# Altium PCB PCB._RFID.PcbDoc
Units mm, origin at the board's own origin, x right, y up, seen from the top; angles counter-clockwise.
Board outline 55 x 58.05 mm, 2 copper layers (Top Layer, Bottom Layer); 46 components, 55 nets, 176 pads, 4 vias.
Unrouted connection lines stored in the file: 33.
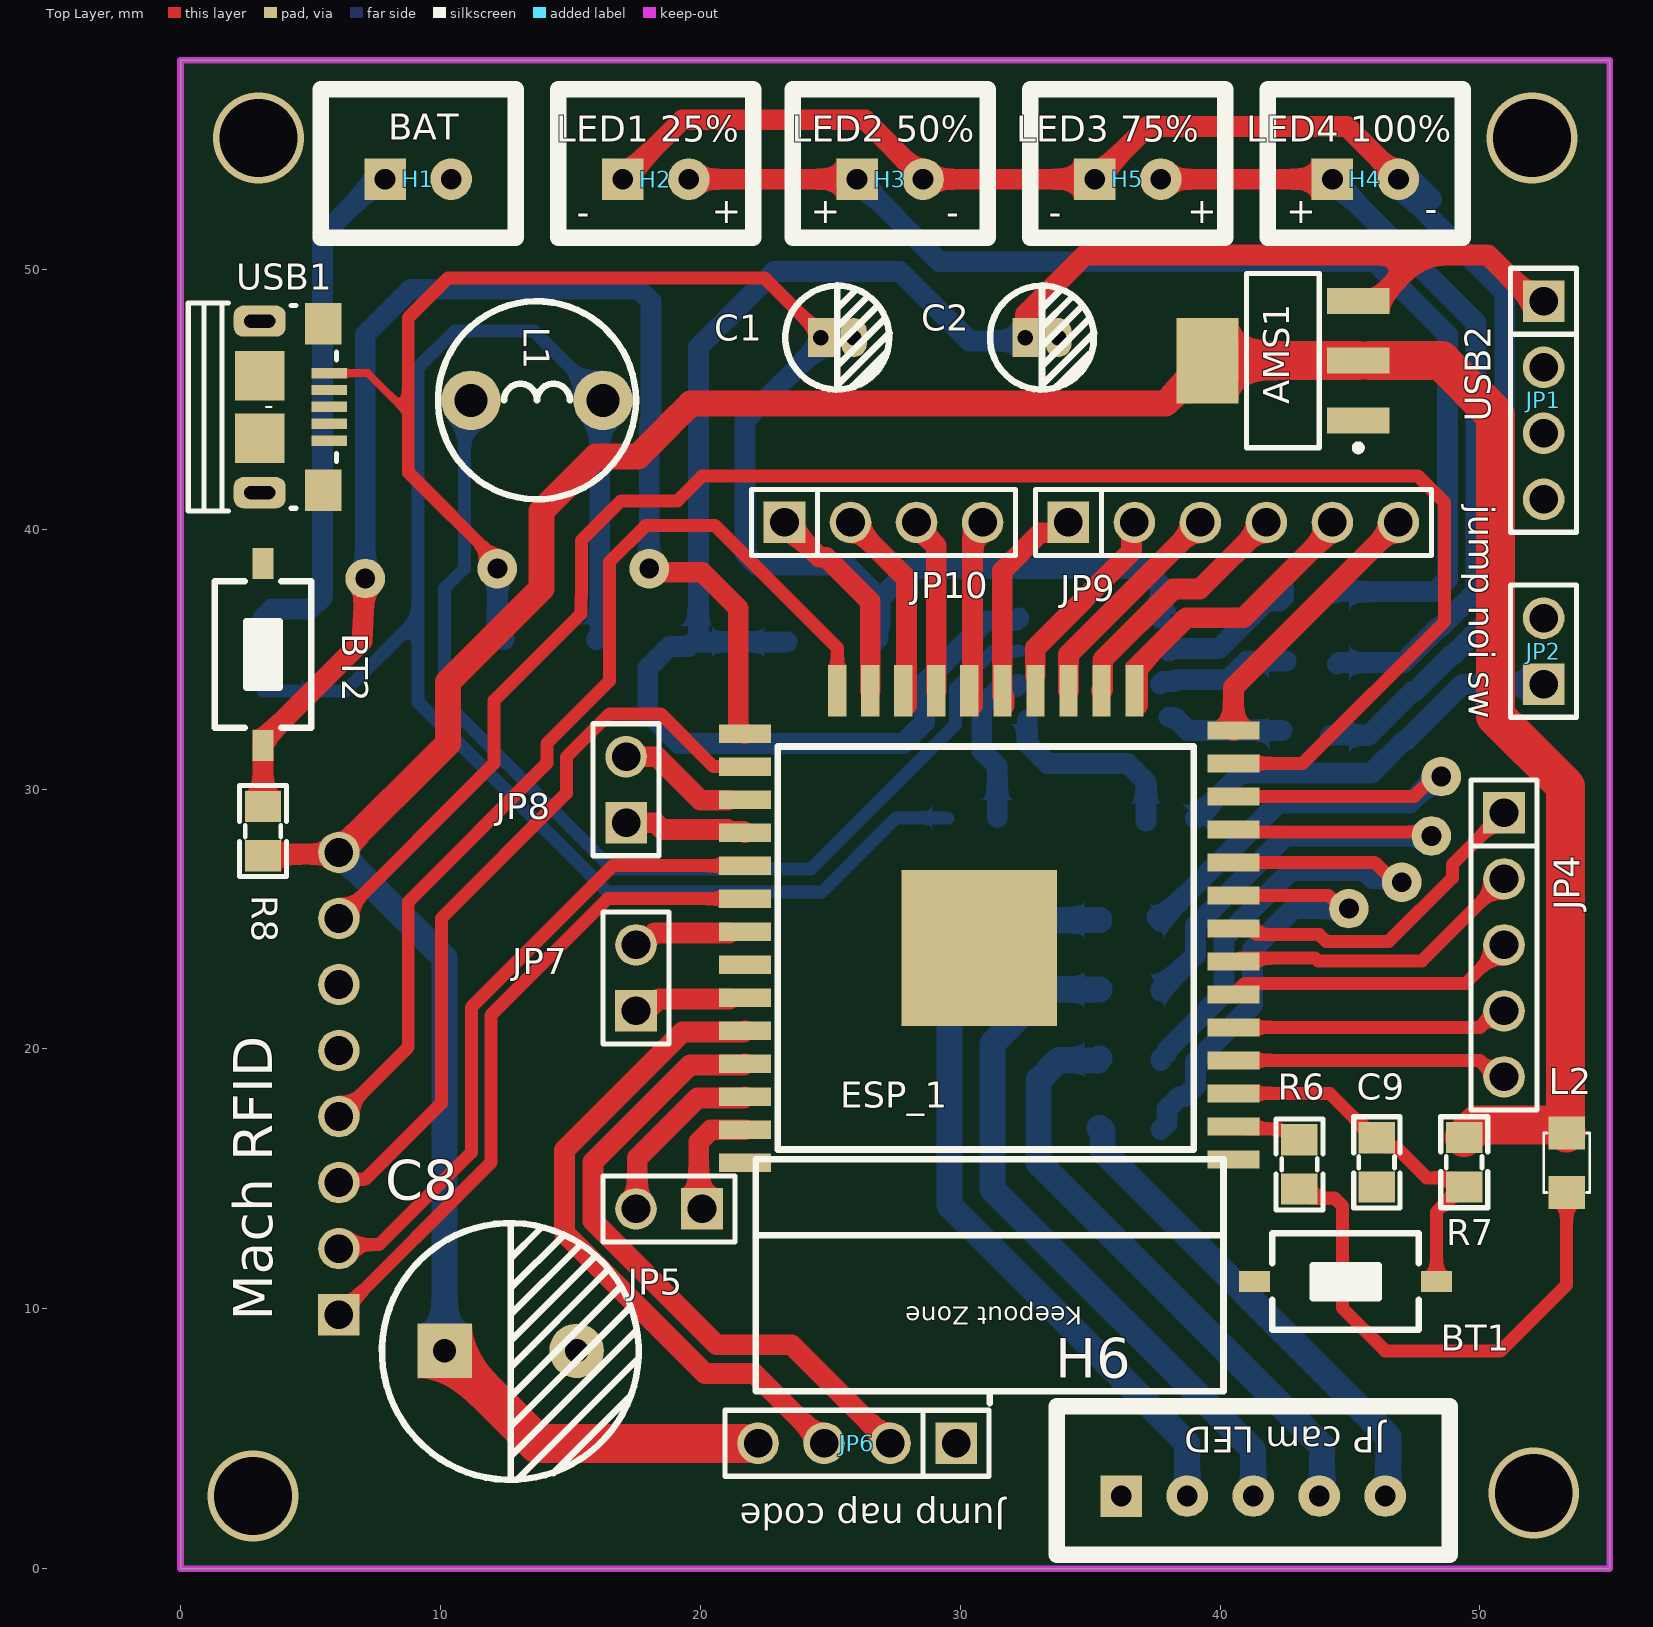
[diagram p0: Top Layer view]
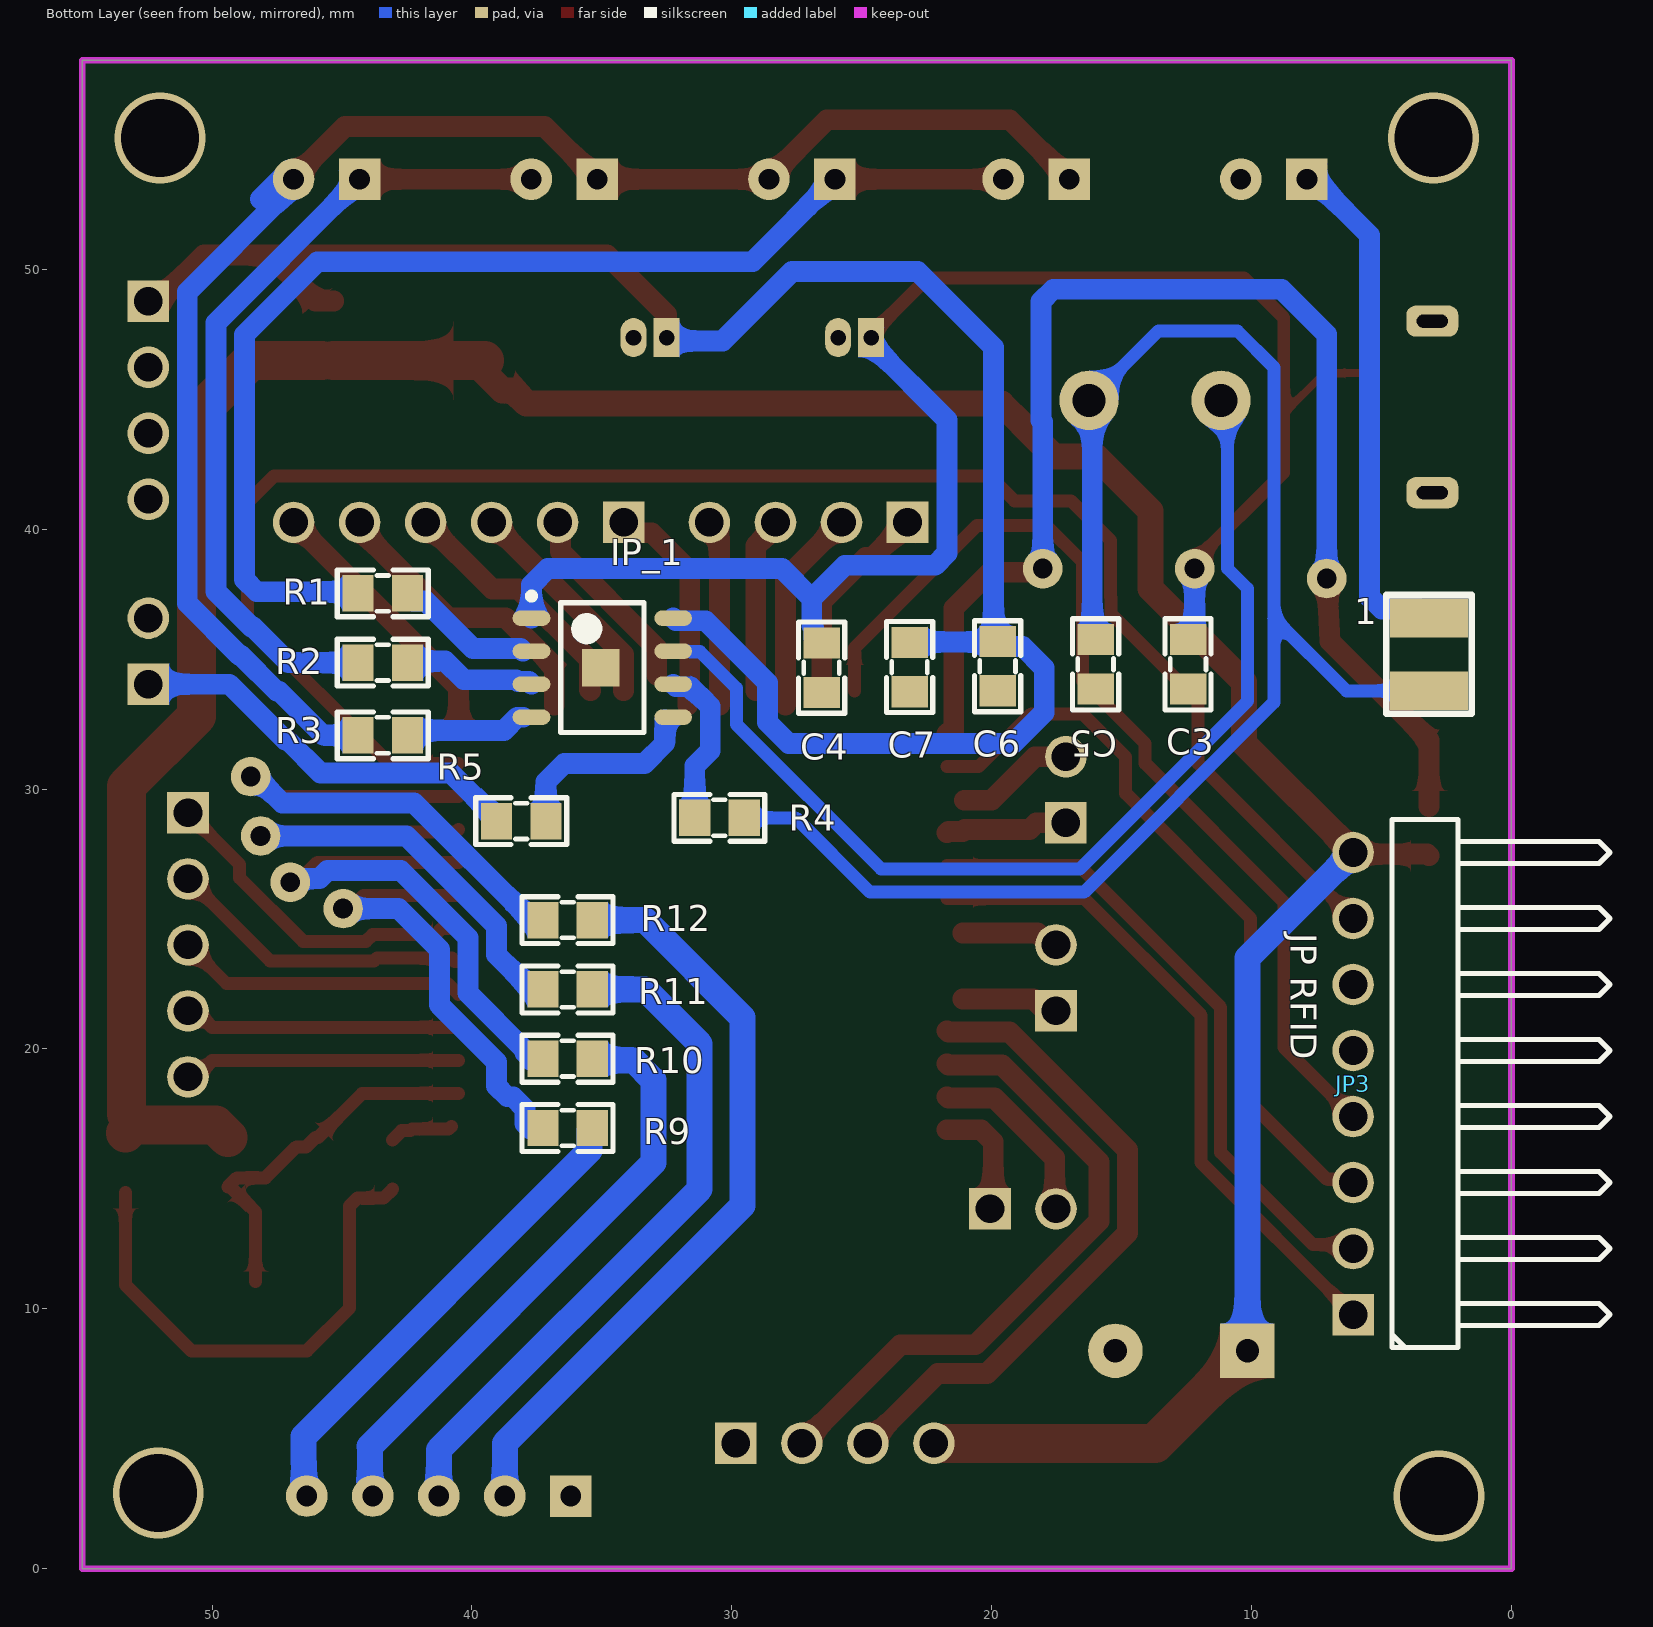
[diagram p1: Bottom Layer view, seen from below]
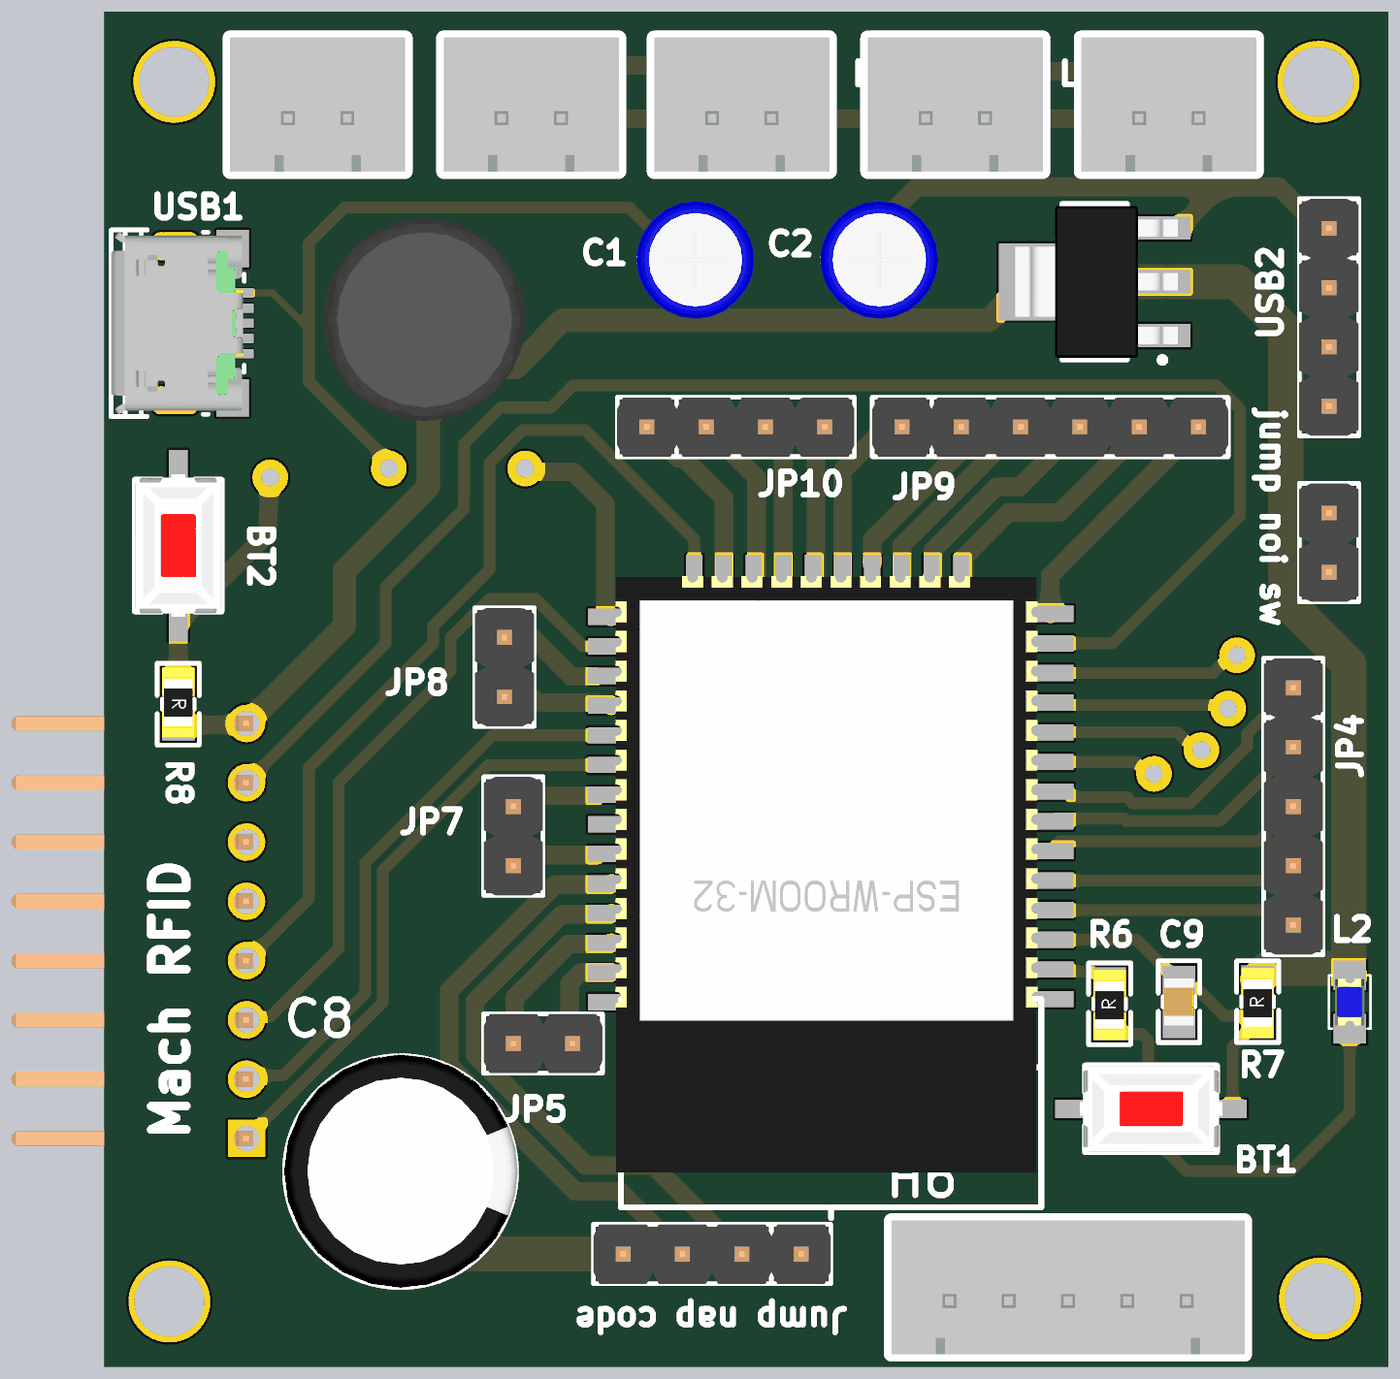
[diagram p2: 3D render of the assembled board from above, using the file's embedded part models]
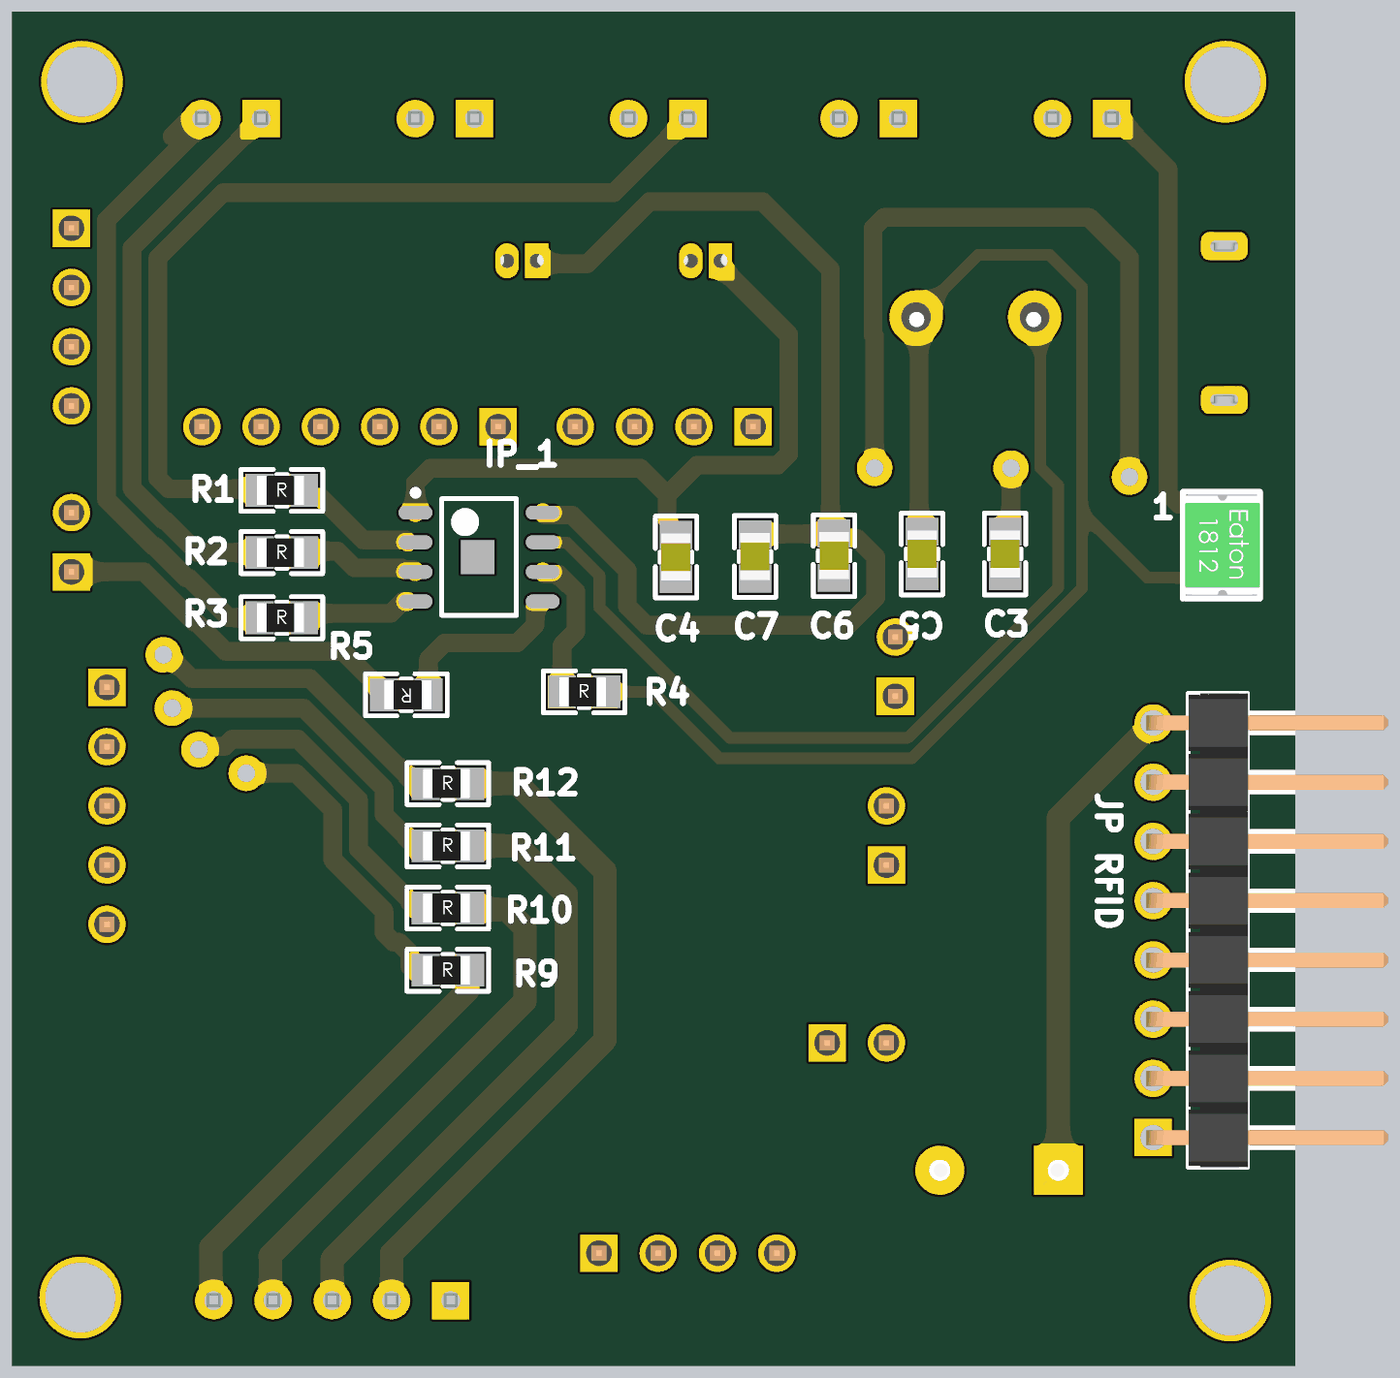
[diagram p3: 3D render of the assembled board from below, using the file's embedded part models]

## Layer stack, top to bottom
Top Solder: solder mask 0.0102, Solder Resist, Dk 3.5
Top Layer: signal copper 0.0356
Dielectric 1: dielectric 0.32, FR-4, Dk 4.8
Bottom Layer: signal copper 0.0356
Bottom Solder: solder mask 0.0102, Solder Resist, Dk 3.5

## Board outline
0,0 0,58.048 55,58.048 55,0

## Design rules (kind name [scope] priority, off if disabled: settings)
Clearance [All] p1: gap=0.25 ignorepadtopadclearanceinfootprint=FALSE
PolygonConnect [All] p1: connectstyle=Relief reliefconductorwidth=0.254 reliefentries=4 polygonreliefangle="90 Angle" airgapwidth=0.254
RoomDefinition Schematic_RFID [InComponentClass('Schematic_RFID')] p1: confinementstyle=ConfineIn formatcopy=TRUE lockcomponents=FALSE outline 59.055,5.151 379.222,5.151 379.222,36.901 59.055,36.901
RoutingVias [All] p1: holewidth=0.711 width=1.27 viastyle="Through Hole" minholewidth=0.711 minwidth=1.27 maxholewidth=0.711 maxwidth=1.27
SolderMaskExpansion [All] p1: expansion=0.102 istentingtop=FALSE
Width [All] p1: maxlimit=1.5 minlimit=0.3 preferedwidth=0.8
Width GND [InNet('GND')] p2: maxlimit=1.5 minlimit=0.5 preferedwidth=1
Width 3V3 [InNet('3V3')] p3: maxlimit=1.5 minlimit=0.5 preferedwidth=1
30 further rules are at their usual default settings.

## Components (designator, comment, footprint, x,y, rotation, side; value= is the part's Value field where it differs from the comment)
1 "1812_1A_8V_SMD" 1812_1A_8V_SMD 3.175,36.576 r270 bottom
AMS1 "AMS1117-3.3V" SOT223 42.418,46.482 r90 top value="AMS1117-3.3V SOT223"
BT1 "Nut Nhan 2 Chan SMD 3x6x2.5" "Nut Nhan 2 Chan SMD 3x6x2.5" 44.831,11.049 r0 top
BT2 "Nut Nhan 2 Chan SMD 3x6x2.5" "Nut Nhan 2 Chan SMD 3x6x2.5" 3.175,35.179 r270 top
C1 "10uF" "tu hoa 4mm" 25.273,47.371 r0 top
C2 "10uF" "tu hoa 4mm" 33.147,47.371 r0 top
C3 "471" "tu 0805" 12.446,34.798 r90 bottom
C4 "105" "tu 0805" 26.543,34.671 r270 bottom
C5 "471" "tu 0805" 16.002,34.798 r90 bottom
C6 "471" "tu 0805" 19.772,34.725 r90 bottom
C7 "105" "tu 0805" 23.157,34.698 r270 bottom
C8 "220uF" "tu hoa 10mm" 12.7,8.382 r0 top
C9 "106" "tu 0805" 46.031,15.637 r270 top
ESP_1 "ESP32" ESP32_chip 40.132,12.827 r180 top
H1 "Header BAT 18650" XH2.54M-2 7.874,53.467 r0 top
H2 "LED1 25%" XH2.54M-2 17.018,53.467 r0 top
H3 "LED2 50%" XH2.54M-2 26.035,53.467 r0 top
H4 "LED4 100%" XH2.54M-2 44.323,53.467 r0 top
H5 "LED3 75%" XH2.54M-2 35.179,53.467 r0 top
H6 "JP cam LED" XH2.54M-5 36.195,2.794 r0 top
IP_1 "IP5306" IP5306 34.983,34.671 r180 bottom
JP1 "USB2" "JP 1x4 DT" 52.451,48.768 r270 top
JP2 "jump noi sw" "JP 1x2 DT" 52.451,34.036 r90 top
JP3 "JP RFID" "JP 1x8 DC" 3.556,28.829 r90 bottom
JP4 "JP 1x5 2.54" "JP 1x5 DT" 50.927,29.083 r270 top
JP5 "JP 1x2 2.54" "JP 1x2 DT" 20.066,13.843 r180 top
JP6 "Jump nap code" "JP 1x4 DT" 29.845,4.826 r180 top
JP7 "JP 1x2 2.54" "JP 1x2 DT" 17.526,21.463 r90 top
JP8 "JP 1x2 2.54" "JP 1x2 DT" 17.145,28.702 r90 top
JP9 "JP 1x6 2.54" "JP 1x6 DT" 34.163,40.259 r0 top
JP10 "JP 1x4 2.54" "JP 1x4 DT" 23.241,40.259 r0 top
L1 "1uH 3A" "CUON CAM 100uH3A" 13.716,44.958 r0 top
L2 "LED 0805" LED-0805-Blue 53.34,16.764 r270 top
R1 "1k" "tro smd 0805" 43.434,37.592 r180 bottom
R2 "1k" "tro smd 0805" 43.434,34.925 r180 bottom
R3 "1k" "tro smd 0805" 43.434,32.131 r180 bottom
R4 "0R" "tro smd 0805" 30.48,28.956 r180 bottom
R5 "10k" "tro smd 0805" 38.1,28.702 r0 bottom
R6 "330R" "Tro SMD 0805" 42.992,15.551 r90 top
R7 "10k" "tro smd 0805" 49.333,15.637 r90 top
R8 "10k" "tro smd 0805" 3.236,28.386 r270 top
R9 "330R" "Tro SMD 0805" 36.322,17.018 r180 bottom
R10 "330R" "Tro SMD 0805" 36.322,19.685 r180 bottom
R11 "330R" "Tro SMD 0805" 36.322,22.352 r180 bottom
R12 "330R" "Tro SMD 0805" 36.322,25.019 r180 bottom
USB1 "USB Micro 5p DIP" "USB Micro 5p DIP" 3.048,44.704 r270 top

## Footprints (in the part's own frame and the unit in brackets; to place one, negate y for a bottom-side part, rotate by r counter-clockwise, add the part's x,y. Pads: shape width x height; smd on the part's side, far side on the other; paste and mask are expansions set on the pad)
1812_1A_8V_SMD [mm]
  rect 1.5x3 smd: 1(0,0) 2(2.794,0)
  silkscreen extent -0.89,-1.65 3.68,1.65, body extent -0.72,-1.55 3.51,1.65, height 1.42
"CUON CAM 100uH3A" [mil] "100uH3A"
  round 90 hole 50: 1(-100,0) 2(100,0)
  silkscreen extent -150,-150 150,150, body extent -171,-175 171,167, height 394
ESP32_chip [mm]
  rect 2x0.7 smd: 1(-0.381,-2.921) 2(-0.381,-4.191) 3(-0.381,-5.461) 4(-0.381,-6.731) 5(-0.381,-8.001) 6(-0.381,-9.271) 7(-0.381,-10.541) 8(-0.381,-11.811) 9(-0.381,-13.081) 10(-0.381,-14.351) 11(-0.381,-15.621) 12(-0.381,-16.891) 13(-0.381,-18.161) 14(-0.381,-19.431) 25(18.415,-19.304) 26(18.415,-18.034) 27(18.415,-16.764) 28(18.415,-15.494) 29(18.415,-14.224) 30(18.415,-12.954) 31(18.415,-11.684) 32(18.415,-10.414) 33(18.415,-9.144) 34(18.415,-7.874) 35(18.415,-6.604) 36(18.415,-5.334) 37(18.415,-4.064) 38(18.415,-2.794)
  rect 6x6 smd: 1(9.398,-11.049)
  rect 0.7x2 smd: 15(3.429,-20.955) 16(4.699,-20.955) 17(5.969,-20.955) 18(7.239,-20.955) 19(8.509,-20.955) 20(9.779,-20.955) 21(11.049,-20.955) 22(12.319,-20.955) 23(13.589,-20.955) 24(14.859,-20.955)
  silkscreen extent 0,-18.81 18,6.46, body extent 0.17,-21.04 18.24,4.5, height 3.4
IP5306 [mm] "SOP, 8-Leads, Body 4.90x3.90mm, Pitch 1.27mm, IPC Medium Density"
  oval 1.45x0.6 smd: 1(-2.725,1.905) 2(-2.725,0.635) 3(-2.725,-0.635) 4(-2.725,-1.905) 5(2.725,-1.905) 6(2.725,-0.635) 7(2.725,0.635) 8(2.725,1.905)
  rect 1.45x1.45 smd: 9(-0.058,0)
  silkscreen extent -2.85,-2.5 1.6,2.88, body extent -2,-2.5 2,2.5, height 0.25
"JP 1x2 DT" [mm] "2 pins, 1 row, straight, gold plating"
  rect 1.6x1.6 hole 1.1: 1(0,0)
  round 1.6 hole 1.1: 2(2.54,0)
  silkscreen extent -1.27,-1.27 3.81,1.27, body extent -1.27,-1.27 3.81,1.27, height 8.54
"JP 1x4 DT" [mm] "4 pins, 1 row, straight, gold plating"
  rect 1.6x1.6 hole 1.1: 1(0,0)
  round 1.6 hole 1.1: 2(2.54,0) 3(5.08,0) 4(7.62,0)
  silkscreen extent -1.27,-1.27 8.89,1.27, body extent -1.27,-1.27 8.89,1.27, height 8.54
"JP 1x5 DT" [mm] "5 pins, 1 row, straight, gold plating"
  rect 1.6x1.6 hole 1.1: 1(0,0)
  round 1.6 hole 1.1: 2(2.54,0) 3(5.08,0) 4(7.62,0) 5(10.16,0)
  silkscreen extent -1.27,-1.27 11.43,1.27, body extent -1.27,-1.27 11.43,1.27, height 8.54
"JP 1x6 DT" [mm] "6 pins, 1 row, straight, gold plating"
  rect 1.6x1.6 hole 1.1: 1(0,0)
  round 1.6 hole 1.1: 2(2.54,0) 3(5.08,0) 4(7.62,0) 5(10.16,0) 6(12.7,0)
  silkscreen extent -1.27,-1.27 13.97,1.27, body extent -1.27,-1.27 13.97,1.27, height 8.54
"JP 1x8 DC" [mm] "8 pins, 1 row, right angled, gold plating"
  rect 1.6x1.6 hole 1.1: 1(-19.05,2.54)
  round 1.6 hole 1.1: 2(-16.51,2.54) 3(-13.97,2.54) 4(-11.43,2.54) 5(-8.89,2.54) 6(-6.35,2.54) 7(-3.81,2.54) 8(-1.27,2.54)
  silkscreen extent -20.32,-7.34 0,1.04, body extent -20.32,-7.52 0,2.84, height 2.55
LED-0805-Blue [mil]
  rect 50x55 smd: 1(0,0) 2(90,0)
  silkscreen extent 0,-35 90,35, body extent 5,-25 85,25, height 43
"Nut Nhan 2 Chan SMD 3x6x2.5" [mm] "Switch SMD type"
  rect 1.2x0.8 smd: 1(-3.5,0) 2(3.5,0)
  silkscreen extent -2.82,-1.85 2.82,1.85, body extent -3.05,-1.85 3.05,1.85, height 2.5
SOT223 [mm]
  rect 1x2.4 smd: 1(-2.3,-2.9) 2(0,-2.9) 3(2.3,-2.9)
  rect 3.3x2.4 smd: 4(0,2.9)
  silkscreen extent -3.47,-3.03 3.35,1.4, body extent -3.25,-3.56 3.25,3.4, height 1.68
"tro smd 0805" [mm]
  rect 1.2x1.4 smd: 1(-0.946,-0.061) 2(0.954,-0.061)
  silkscreen extent -1.75,-0.97 1.75,0.84, body extent -1.56,-0.76 1.44,0.64, height 0.53
"Tro SMD 0805" [mm]
  rect 1.2x1.4 smd: 1(-0.946,-0.061) 2(0.954,-0.061)
  silkscreen extent -1.75,-0.97 1.75,0.84, body extent -1.56,-0.76 1.44,0.64, height 0.53
"tu 0805" [mm] "Compoment SMD 80x50mil"
  rect 1.2x1.4 smd: 1(-0.946,-0.003) 2(0.954,-0.003)
  silkscreen extent -1.75,-0.89 1.75,0.89, body extent -1.01,-0.64 1.01,0.63, height 0.61
"tu hoa 4mm" [mm]
  rect 1x1.5 hole 0.6: 1(-0.635,0)
  oval 1x1.5 hole 0.6: 2(0.635,0)
  silkscreen extent -2,-2 2.01,2.01, body extent -2.47,-2.47 2.58,2.58, height 14.81
"tu hoa 10mm" [mm]
  rect 2.1x2.1 hole 0.9: 1(-2.54,0)
  round 2.1 hole 0.9: 2(2.54,0)
  silkscreen extent -4.95,-4.96 4.93,4.92, body extent -5,-5 4.97,5, height 20.01
"USB Micro 5p DIP" [mm]
  rect 0.4x1.35 smd mask+0.05: 1(-1.3,2.675) 2(-0.65,2.675) 3(0,2.675) 4(0.65,2.675) 5(1.3,2.675)
  rrect60% 1.2x2 hole 0.5 slot 1.2 at 90 deg: 5(-3.3,0) 5(3.3,0)
  rect 1.6x1.4 smd: 5(-3.2,2.45) 5(3.2,2.45)
  rect 1.9x1.9 smd paste-10: 5(-1.2,0) 5(1.2,0)
  silkscreen extent -4,-2.75 4,2.95, body extent -3.93,-2.76 3.93,2.9, height 2.85
XH2.54M-2 [mm]
  rect 1.6x1.6 hole 0.8: 1(0,0)
  round 1.6 hole 0.8: 2(2.54,0)
  silkscreen extent -2.48,-2.26 5.02,3.46, body extent -2.48,-2.26 5.02,3.48, height 6.91
XH2.54M-5 [mm]
  rect 1.6x1.6 hole 0.8: 1(0,0)
  round 1.6 hole 0.8: 2(2.54,0) 3(5.08,0) 4(7.62,0) 5(10.16,0)
  silkscreen extent -2.48,-2.26 12.64,3.46, body extent -2.48,-2.26 12.64,3.48, height 6.91

## Part data
AMS1: library part "AMS1117 SMD", "Dán", Chung_Loai=Dán, Don_Vi=Con, Ma_Hang=MH000596
C1 C2: library part "Tu Hoa 10uF 25V 4x7", "Cắm", Chung_Loai=Cắm, Don_Vi=Con, Ma_Hang=MH001349, So_Chan=2, Ten_Linh_Kien="Tụ Hóa 10uF 25V 4x7MM"
C3 C5 C6: library part "Tu 0805 471 50V 10%", "Dán", Chung_Loai=Dán, Don_Vi=Con, Ma_Hang=MH004564, So_Chan=2, Ten_Linh_Kien="Tụ 0805 471-470 10% 50V"
C4 C7: library part "Tu 0805 105 50V 10%", "Dán", Chung_Loai=Dán, Don_Vi=Con, Ma_Hang=MH004552, So_Chan=2, Ten_Linh_Kien="Tụ 0805 105-1uF 10% 50V"
C8: library part "Tu Hoa 220uF 50V 10x14", "Cắm", Chung_Loai=Cắm, Don_Vi=Con, Ma_Hang=MH006873, So_Chan=2, Ten_Linh_Kien="Tụ Hóa 220uF 50V"
C9: library part "Tu 0805 106 16V 10%", "Dán", Chung_Loai=Dán, Don_Vi=Con, Ma_Hang=MH004553, So_Chan=2, Ten_Linh_Kien="Tụ 0805 106-10uF 10% 16V"
ESP_1: library part ESP32_CHIP
H1 H2 H3 H4 H5: library part "Header 2P 2.54 Duc Thang", "Cắm", Chung_Loai=Cắm, Don_Vi=Con, Ma_Hang=MH001283, Ten_Linh_Kien="Header 2P XH2.54-2P Đực Thẳng"
H6: library part "Header 5P 2.54 Duc Thang", "Cắm", Chung_Loai=Cắm, Don_Vi=Con, Ma_Hang=MH001298, Ten_Linh_Kien="Header 5P XH2.54-5P Đực Thẳng"
JP1 JP6 JP10: library part "JP 1x4 2.54 Duc Thang", "Cắm", Chung_Loai=Cắm, Don_Vi=Con, Ma_Hang=MH000903, Ten_Linh_Kien="Jump Đơn Đực 2.54MM 1x40P Thẳng 11MM"
JP2 JP5 JP7 JP8: library part "JP 1x2 2.54 Duc Thang", "Cắm", Chung_Loai=Cắm, Don_Vi=Con, Ma_Hang=MH000903, Ten_Linh_Kien="Jump Đơn Đực 2.54MM 1x40P Thẳng 11MM"
JP3: library part "JP 1x8 2.54 Duc Cong", "Cắm", Chung_Loai=Cắm, Don_Vi=Con, Ma_Hang=MH000904, Ten_Linh_Kien="Jump Đơn Đực 2.54MM 1x40P Cong Đứng"
JP4: library part "JP 1x5 2.54 Duc Thang", "Cắm", Chung_Loai=Cắm, Don_Vi=Con, Ma_Hang=MH000903, Ten_Linh_Kien="Jump Đơn Đực 2.54MM 1x40P Thẳng 11MM"
JP9: library part "JP 1x6 2.54 Duc Thang", "Cắm", Chung_Loai=Cắm, Don_Vi=Con, Ma_Hang=MH000903, Ten_Linh_Kien="Jump Đơn Đực 2.54MM 1x40P Thẳng 11MM"
L1: library part "CUON CAM 100uH DIP", "Dán", Chung_Loai=Dán, Don_Vi=Con, Ma_Hang=MH002209, Ten_Linh_Kien="Cuộn Cảm 100uH 3A 8x10MM"
L2: library part "LED 0805 Xanh Duong", "Dán", Chung_Loai=Dán, Don_Vi=Con, Ma_Hang=MH002327, Ten_Linh_Kien="LED 0805 Màu Xanh Dương (Blue)"
R1 R2 R3: library part "Tro 0805 1% 1k", "Dán", Chung_Loai=Dán, Don_Vi=Con, Ma_Hang=MH005468, So_Chan=2, Ten_Linh_Kien="Trở 0805 1% 1k"
R4: library part "Tro 0805 5% 0R", "Dán", Chung_Loai=Dán, Don_Vi=Con, Ma_Hang=MH005230, So_Chan=2, Ten_Linh_Kien="Trở 0805 5% 0R"
R5: library part "Tro 0805 5% 10k", "Dán", Chung_Loai=Dán, Don_Vi=Con, Ma_Hang=MH005239, So_Chan=2, Ten_Linh_Kien="Trở 0805 5% 10k"
R6 R9 R10 R11 R12: library part "Tro 0805 5% 330R", "Dán", Chung_Loai=Dán, Don_Vi=Con, Ma_Hang=MH005337, So_Chan=2, Ten_Linh_Kien="Trở 0805 5% 330R"
R7 R8: library part "Tro 0805 1% 10k", "Dán", Chung_Loai=Dán, Don_Vi=Con, Ma_Hang=MH005473, So_Chan=2, Ten_Linh_Kien="Trở 0805 1% 10k"
USB1: "USB Type B", Ma_Hang=MH005145, Ten="MicroUSB MK5P DIP"
BT1 BT2: Ma_Hang=MH001036, Ten="Nút Nhấn 2 Chân 3x6x2.5MM SMD"

## Free pads (board coordinates)
  round 1.524 hole 0.762: 2(7.112,38.1) 2(18.034,38.481) ""(12.192,38.481) ""(44.958,25.4) ""(46.99,26.416) ""(48.133,28.194) ""(48.514,30.48)

## Via types
v1: diameter 3.5, hole 3, Top Layer to Bottom Layer, 4 vias

## Nets (pads, with @x,y where several pads share a name; then routed paths per layer and width w, separated by ;. In a path a pad name is that pad's centre, name@x,y a point inside that pad or via, vN(x,y) a via of type N, cw(c..) or ccw(c..) an arc to the next point about the centre after c; other vN are vias at no path point)
3V3: AMS1.2 AMS1.4 C8.1 JP3.8 JP6.4 L2.1 R7.2 R8.2 | length 125.9
  Top Layer w0.8: R8.2 3.238,27.495 6.032,27.495 JP3.8
  Top Layer w1: JP3.8 10.287,31.75 10.287,34.113 13.881,37.707 13.881,40.69 15.99,42.799 17.607,42.799 18.834,44.026 18.834,44.04 19.625,44.831 37.899,44.831 38.4,45.332 38.818,45.332 39.518,46.032 AMS1.4
  Top Layer w1.5: C8.1 13.716,4.826 JP6.4 ; AMS1.4 AMS1.2 ; AMS1.2@45.768,46.482 48.514,46.482 50.601,44.395 50.601,36.217 50.601,32.801 53.298,30.104 53.298,17.492 ; R7.2 49.875,17.073 53.031,17.073 L2.1
  Bottom Layer w1: JP3.8 10.16,23.495 C8.1 ; JP6.4@22.225,4.763 JP6.4
13: ESP_1.16 JP9.4 | length 9.7
  Top Layer w0.8: ESP_1.16 35.483,33.832 35.483,34.975 38.202,37.694 39.218,37.694 JP9.4
14: ESP_1.14 JP9.6 | length 10.6
  Top Layer w0.8: ESP_1.14 40.513,33.909 JP9.6
15: ESP_1.23 JP10.1 | length 8
  Top Layer w0.8: JP10.1 24.581,38.919 24.835,38.919 26.543,37.211 ESP_1.23
16: ESP_1.27 JP8.2 | length 4.6
  Top Layer w0.8: JP8.2 18.338,31.242 20.01,29.569 ESP_1.27@21.046,29.569
17: ESP_1.28 JP8.1 | length 4.7
  Top Layer w0.8: JP8.1 18.288,28.702 18.542,28.448 21.04,28.448 21.117,28.371 21.667,28.371 ESP_1.28
19: ESP_1.31 JP7.2 | length 3.8
  Top Layer w0.8: JP7.2@17.606,23.829 18.238,24.461 ESP_1.31@21.117,24.461
21: ESP_1.33 JP7.1 | length 4.3
  Top Layer w0.8: JP7.1@17.242,21.179 JP7.1 ; JP7.1@17.671,21.227 JP7.1@17.925,21.227 ; JP7.1@17.926,21.228 17.926,21.452 18.395,21.921 ESP_1.33@21.117,21.921
22: ESP_1.36 JP5.2 | length 6.8
  Top Layer w0.8: JP5.2@17.578,14.097 17.578,15.8 19.889,18.111 21.667,18.111 ESP_1.36
23: ESP_1.37 JP5.1 | length 4.1
  Top Layer w0.8: JP5.1@19.939,14.267 19.939,16.422 20.408,16.891 ESP_1.37
25: ESP_1.10 pad.@46.99,26.416 R10.1 | length 20.6
  Top Layer w0.5: ESP_1.10 45.951,27.178 46.713,26.416 pad.@46.99,26.416
  Bottom Layer w0.8: R10.1@37.719,19.558 37.719,19.621 37.954,19.856 37.954,19.952 40.154,22.152 40.154,24.279 42.737,26.862 45.564,26.862 45.871,26.555 46.851,26.555 pad.@46.99,26.416
26: ESP_1.11 pad.@48.133,28.194 R11.1 | length 21.3
  Top Layer w0.5: ESP_1.11 40.613,28.348 47.979,28.348 pad.@48.133,28.194
  Bottom Layer w0.8: R11.1@37.719,22.225 37.719,22.288 39.054,23.624 39.054,24.735 42.513,28.194 pad.@48.133,28.194
27: ESP_1.12 pad.@48.514,30.48 R12.1 | length 21.6
  Top Layer w0.5: ESP_1.12 47.475,29.718 48.237,30.48 pad.@48.514,30.48
  Bottom Layer w0.8: R12.1@37.565,25.08 R12.1@37.659,25.174 ; R12.1@37.719,24.892 37.719,24.956 42.227,29.464 47.302,29.464 48.318,30.48 pad.@48.514,30.48
32: ESP_1.8 JP4.1 | length 13
  Top Layer w0.5: ESP_1.8 41.163,24.638 41.402,24.399 43.819,24.399 44.08,24.138 46.497,24.138 48.945,26.586 48.945,27.101 JP4.1
33: ESP_1.9 pad.@44.958,25.4 R9.1 | length 17.5
  Top Layer w0.5: ESP_1.9 44.173,25.908 44.681,25.4 pad.@44.958,25.4
  Bottom Layer w0.8: R9.1@37.719,16.891 37.954,17.126 37.954,17.691 38.423,18.159 38.644,18.159 39.054,18.57 39.054,19.496 41.254,21.696 41.254,23.823 42.831,25.4 pad.@44.958,25.4
34: ESP_1.6 JP4.3 | length 11.2
  Top Layer w0.5: ESP_1.6 40.933,22.518 49.442,22.518 JP4.3
35: ESP_1.7 JP4.2 | length 12.1
  Top Layer w0.5: ESP_1.7 40.667,23.368 40.767,23.468 40.767,23.495 43.662,23.495 43.769,23.388 47.772,23.388 JP4.2
  Top Layer w0.8: JP4.2@50.927,26.327 JP4.2
BAT: 1.1 H1.1 | length 19.6
  Bottom Layer w0.8: 1.1 3.525,36.926 4.992,36.926 5.461,37.395 5.461,51.308 7.22,53.067 7.474,53.067 H1.1@7.683,53.276
BOOT: BT2.2 ESP_1.25 pad.2 R8.1 | length 50.7
  Top Layer w0.8: R8.1 BT2.2 3.175,31.879 6.985,35.689 pad.2@7.112,38.1 ; pad.2@18.034,38.481 18.173,38.342 20.078,38.342 21.463,36.957 21.463,32.181 21.667,32.181 ESP_1.25
  Bottom Layer w0.8: pad.2@7.112,38.434 7.112,47.498 8.847,49.233 17.63,49.233 18.099,48.764 18.099,44.195 18.034,44.13 pad.2@18.034,38.481
CLK: ESP_1.20 JP10.4 | length 7.2
  Top Layer w0.8: ESP_1.20@30.48,33.239 30.48,39.662 30.861,40.043 JP10.4
CMD: ESP_1.19 JP9.1 | length 8.4
  Top Layer w0.8: ESP_1.19@31.7,33.239 31.7,33.544 31.623,33.621 31.623,38.399 33.083,39.859 33.763,39.859 33.909,40.005 JP9.1@33.909,40.259
EN: BT1.2 C9.1 ESP_1.3 R7.1 | length 14.4
  Top Layer w0.5: ESP_1.3 44.223,18.288 45.928,16.583 C9.1 46.378,16.233 46.759,16.233 47.95,15.042 49.044,15.042 R7.1 ; BT1.2 48.331,13.729 R7.1@49.294,14.692
GND: AMS1.1 BT1.1 BT2.1 C1.2 C2.2 C3.1 C4.2 C5.1 C6.1 C7.2 C8.2 C9.2 ESP_1.1 ESP_1.15 ESP_1.38 H1.2 H6.1 IP_1.9 JP1.4 JP2.2 JP3.6 JP6.1 JP9.5 USB1.5 | length 11.4
  Top Layer w0.8: ESP_1.15@36.83,33.239 36.83,34.713 38.711,36.594 40.912,36.594 43.923,39.605 43.923,39.643 44.323,40.043 JP9.5
  other v1: 2.794,2.794 52.07,2.921 3,55.048 52,55.048
MISO: ESP_1.24 JP3.4 | length 38.8
  Top Layer w0.5: JP3.4 5.969,17.526 6.223,17.526 8.763,20.066 8.763,25.654 14.097,30.988 14.097,31.75 16.508,34.161 16.508,38.74 17.9,40.132 20.574,40.132 25.273,35.433 ESP_1.24
MOSI: ESP_1.26 JP3.3 | length 28.9
  Top Layer w0.5: JP3.3 6.223,14.986 7.112,14.986 10.033,17.907 10.033,25.019 14.847,29.833 14.847,31.23 16.51,32.893 18.474,32.893 20.506,30.861 ESP_1.26
NetESP_1_2: ESP_1.2 R6.2 | length 2.5
  Top Layer w0.5: ESP_1.2@40.794,17.018 40.894,16.918 42.31,16.918 42.373,16.855 42.703,16.855 R6.2
NetH2_1: H2.1 H3.2 H4.2 H5.1 R3.1 | length 62.3
  Top Layer w0.8: H2.1 19.304,55.753 26.339,55.753 28.575,53.517 H3.2 H5.1 37.211,55.499 44.881,55.499 46.863,53.517 H4.2
  Bottom Layer w0.8: R3.1@44.24,32.07 45.723,32.07 47.417,33.764 47.511,33.764 48.882,35.136 48.938,35.136 50.951,37.149 50.951,49.125 47.263,52.813 47.263,52.851 H4.2@46.938,53.175 ; H4.2 47.016,53.314 47.016,53.822 47.27,53.568 48.133,52.705
NetH2_2: H2.2 H3.1 R1.1 | length 45.7
  Top Layer w0.8: H2.2 H3.1
  Bottom Layer w0.8: H3.1 29.21,50.292 45.942,50.292 48.751,47.483 48.751,38.061 48.282,37.592 44.44,37.592 R1.1
NetH4_1: H4.1 H5.2 R2.1 | length 31.3
  Top Layer w0.8: H5.2 H4.1
  Bottom Layer w0.8: H4.1 44.731,53.059 49.851,47.939 49.851,37.605 48.482,36.236 48.427,36.236 47.055,34.864 44.58,34.864 R2.1@44.513,34.798
NetH6_2: H6.2 R12.2 | length 29.5
  Bottom Layer w1: R12.2 33.34,24.958 29.591,21.209 29.591,13.97 38.735,4.826 H6.2
NetH6_3: H6.3 R11.2 | length 26.5
  Bottom Layer w1: R11.2 33.34,22.291 31.242,20.193 31.242,14.605 41.275,4.572 H6.3
NetH6_4: H6.4 R10.2 | length 23.3
  Bottom Layer w1: R10.2 35.301,19.558 33.782,19.558 33.02,18.796 33.02,15.621 43.942,4.699 43.93,4.687 43.93,2.909 H6.4
NetH6_5: H6.5 R9.2 | length 18.8
  Bottom Layer w1: R9.2 35.468,16.857 35.468,16.094 46.482,5.08 46.482,4.083 46.47,4.071 46.47,2.909 H6.5
NetIP_1_2: IP_1.2 R1.2 | length 5.6
  Bottom Layer w0.8: IP_1.2@38.031,35.306 38.131,35.406 39.956,35.406 41.781,37.231 42.28,37.231 42.44,37.392 R1.2@42.44,37.719
NetIP_1_3: IP_1.3 R2.2 | length 5.2
  Bottom Layer w0.8: IP_1.3 37.808,34.136 38.233,34.136 38.303,34.206 40.312,34.206 41.031,34.925 R2.2@42.544,34.925
NetIP_1_4: IP_1.4 R3.2 | length 4.6
  Bottom Layer w0.8: IP_1.4@38.033,32.766 38.256,32.766 38.764,32.258 R3.2@42.393,32.258
NetIP_1_5: IP_1.5 R5.1 | length 7.6
  Bottom Layer w0.8: IP_1.5@32.583,32.666 32.583,31.765 33.36,30.988 36.449,30.988 37.154,30.283 R5.1
NetIP_1_6: IP_1.6 R4.1 | length 6.3
  Bottom Layer w0.8: R4.1 31.426,30.891 30.833,31.484 30.833,33.18 31.589,33.936 32.158,33.936 IP_1.6
NetIP_1_7: IP_1.7 L1.1 | length 41.1
  Bottom Layer w0.5: L1.1 10.93,44.712 10.93,38.489 10.16,37.719 10.16,33.38 16.616,26.924 24.257,26.924 29.826,32.493 29.826,33.89 31.223,35.287 32.112,35.287 32.131,35.306 IP_1.7
NetJP2_1: JP2.1 R5.2 | length 15.5
  Bottom Layer w0.8: R5.2@39.054,28.863 40.814,30.623 45.831,30.623 47.085,31.877 47.179,31.877 49.338,34.036 JP2.1
NetL2_2: L2.2 R6.1 | length 19.8
  Top Layer w0.5: R6.1 43.403,14.255 44.411,14.255 44.704,13.962 44.704,10.033 46.355,8.382 50.8,8.382 53.34,10.922 L2.2
RST: ESP_1.13 JP3.7 | length 68
  Top Layer w0.5: JP3.7 12.065,30.988 12.065,33.401 15.409,36.745 15.409,37.38 15.422,37.393 15.422,39.563 16.952,41.093 19.122,41.093 20.066,42.037 47.625,42.037 48.641,41.021 48.641,36.449 43.18,30.988 ESP_1.13
RX0: ESP_1.34 JP6.3 | length 25.4
  Top Layer w0.8: ESP_1.34 21.667,20.651 19.318,20.651 19.148,20.481 14.775,16.108 14.775,12.917 20.178,7.514 22.077,7.514 JP6.3
SCK: ESP_1.29 JP3.2 | length 25
  Top Layer w0.5: JP3.2 6.249,12.472 7.646,12.472 11.188,16.014 11.188,21.602 16.637,27.051 ESP_1.29
SD0: ESP_1.21 JP10.3 | length 6.8
  Top Layer w0.8: JP10.3@28.194,40.236 29.083,39.347 ESP_1.21
SD1: ESP_1.22 JP10.2 | length 7.9
  Top Layer w0.8: JP10.2 27.94,38.1 ESP_1.22@27.94,33.239
SD2: ESP_1.17 JP9.3 | length 8.6
  Top Layer w0.8: ESP_1.17 34.163,35.179 JP9.3
SD3: ESP_1.18 JP9.2 | length 7.5
  Top Layer w0.8: ESP_1.18@32.893,34.382 32.893,35.433 36.597,39.137 36.597,40.153 JP9.2
SDA: ESP_1.30 JP3.1 | length 25.6
  Top Layer w0.5: JP3.1 11.938,15.621 11.938,21.291 16.428,25.781 ESP_1.30
TX0: ESP_1.35 JP6.2 | length 24.7
  Top Layer w0.8: ESP_1.35 21.667,19.381 19.603,19.381 15.875,15.653 15.875,13.373 20.633,8.614 23.517,8.614 JP6.2
VBAT: 1.2 C5.2 L1.2 R4.2 | length 63.1
  Bottom Layer w0.5: 1.2 6.35,33.782 9.144,36.576 ; L1.2 13.589,47.625 10.541,47.625 9.144,46.228 9.144,36.576 ; R4.2 27.543,28.895 24.683,26.035 16.444,26.035 9.144,33.335 9.144,36.576
  Bottom Layer w0.8: C5.2 16.129,35.883 L1.2@16.129,44.831 ; L1.2@16.761,44.992 16.946,45.178 L1.2@16.764,45.36
VIN: C1.1 C3.2 C4.1 IP_1.1 pad.@12.192,38.481 USB1.1 | length 65.1
  Top Layer w0.3: USB1.1 7.209,46.004 8.763,44.45
  Top Layer w0.5: pad.@12.319,38.735 12.215,38.735 8.763,42.187 8.763,44.45 8.763,48.133 10.287,49.657 22.479,49.657 24.265,47.871 24.388,47.871 24.427,47.832 C1.1@24.427,47.455
  Bottom Layer w0.8: pad.@12.192,38.481 12.192,35.952 12.392,35.752 C3.2 ; C1.1 24.538,47.271 24.538,47.021 21.717,44.2 21.717,39.077 22.186,38.608 25.654,38.608 26.927,37.335 28.074,38.481 37.084,38.481 37.708,37.857 IP_1.1 ; C4.1 26.646,35.617 26.846,35.817 26.846,36.208 26.924,36.285 26.924,37.338
VN: ESP_1.5 JP4.4 | length 11
  Top Layer w0.5: ESP_1.5 49.994,20.828 50.629,21.463 JP4.4
  Top Layer w0.8: JP4.4@50.711,21.464 JP4.4@51.055,21.464
VOUT: AMS1.3 C2.1 C6.2 C7.1 IP_1.8 JP1.1 | length 77
  Top Layer w0.8: C2.1 32.512,48.26 34.798,50.546 47.782,50.546 ; AMS1.3 46.018,48.782 47.782,50.546 ; JP1.1 52.051,49.168 51.69,49.168 50.312,50.546 47.782,50.546
  Bottom Layer w0.8: C6.2 C6.2@19.75,35.661 ; C6.2@19.931,35.68 19.931,46.997 22.845,49.911 27.686,49.911 30.353,47.244 C2.1@32.412,47.244 ; C7.1@23.34,35.661 C6.2@19.75,35.661 ; IP_1.8 32.158,36.476 31.018,36.476 28.633,34.091 28.633,32.573 27.81,31.75 19.177,31.75 17.983,32.944 17.983,34.657 18.806,35.48 19.569,35.48 C6.2@19.75,35.661
VP: ESP_1.4 JP4.5 | length 10.7
  Top Layer w0.5: ESP_1.4 49.994,19.558 50.629,18.923 JP4.5
pads on no net: ESP_1.32 JP1.2 JP1.3 JP3.5 USB1.2 USB1.3 USB1.4

## Keep-outs
Keep-Out Layer:
  the board outline again, w0.254

## Silkscreen, mask and mechanical layers (free items; w line width, h text height)
Top Overlay:
  text "BAT" at 8.001,54.991 h1
  text "-" at 47.879,51.824 h1
  text "+" at 20.447,51.776 h1
  text "+" at 24.257,51.776 h1
  text "+" at 38.735,51.776 h1
  text "+" at 42.545,51.776 h1
  text "-" at 15.24,51.697 h1
  text "-" at 29.464,51.697 h1
  text "-" at 33.401,51.697 h1
  text "Mach RFID" at 3.537,9.544 h1.5 r90

## Text inside footprints (layer, text, board x,y; h text height)
ESP_1: Top Overlay "Keepout Zone" at 34.698,10.081 h0.7 r180